# Altium PCB PCB1.PcbDoc
Units mm, origin at the board's own origin, x right, y up, seen from the top; angles counter-clockwise.
Board outline 45.1 x 100 mm, 2 copper layers (Top Layer, Bottom Layer); 94 components, 55 nets, 258 pads, 0 vias.
Unrouted connection lines stored in the file: 192.
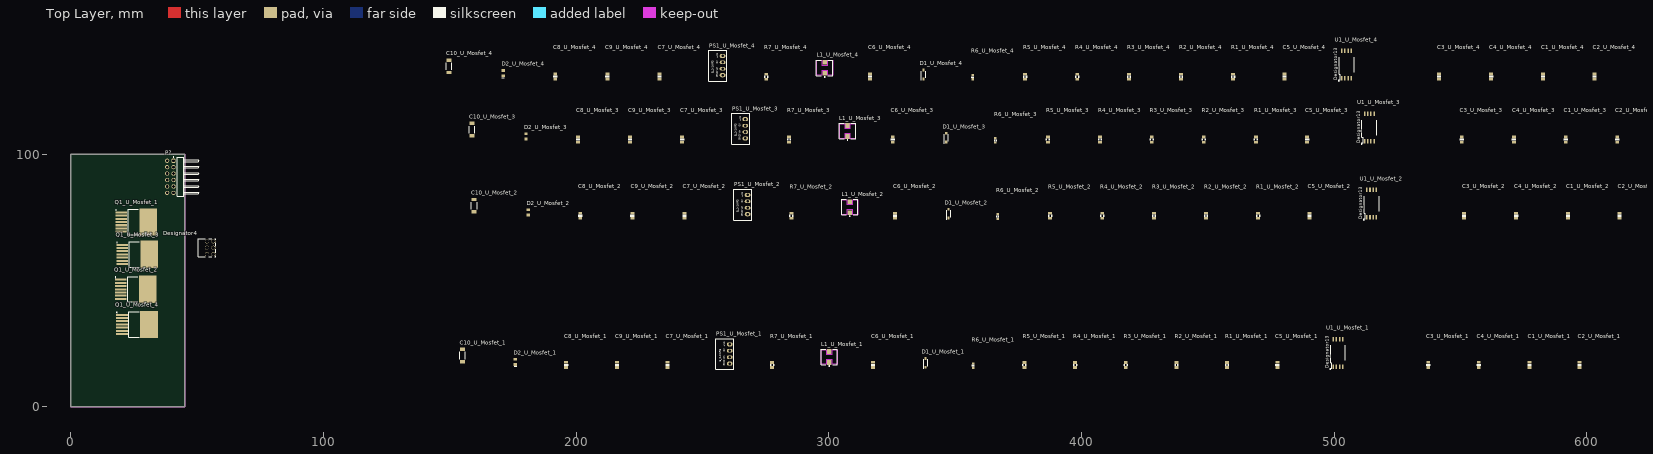
[diagram p0: Top Layer view]
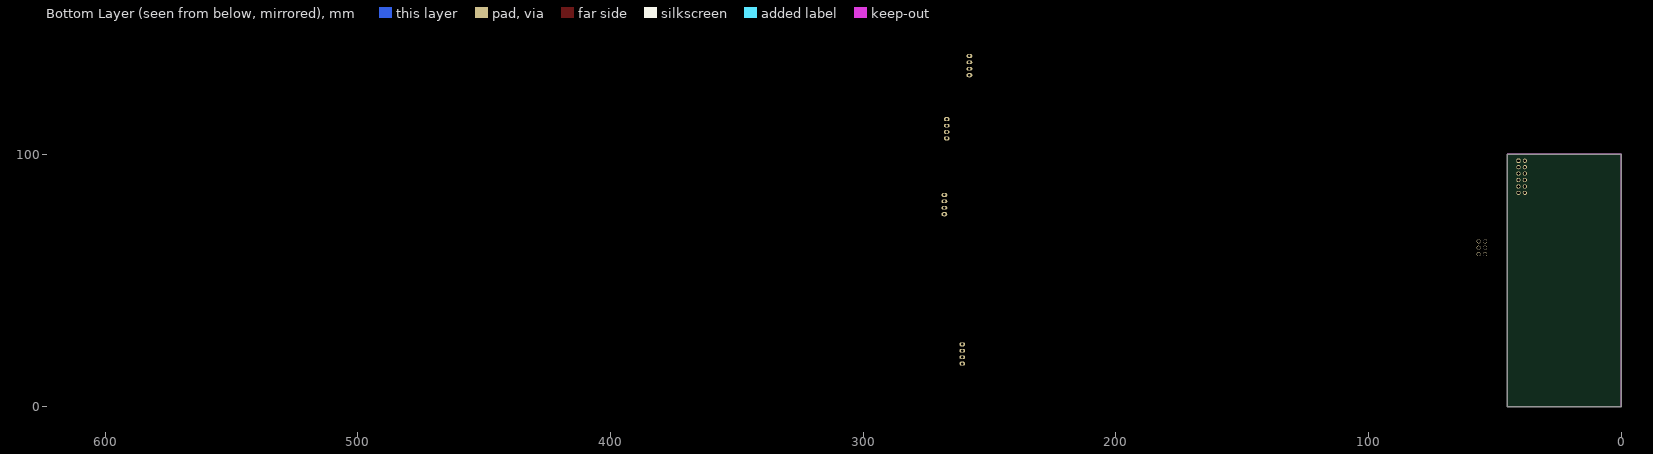
[diagram p1: Bottom Layer view, seen from below]

## Layer stack, top to bottom
Top Solder: solder mask 0.0102, Solder Resist, Dk 3.5
Top Layer: signal copper 0.0356
Dielectric 1: dielectric 0.32, FR-4, Dk 4.8
Bottom Layer: signal copper 0.0356
Bottom Solder: solder mask 0.0102, Solder Resist, Dk 3.5

## Board outline
0,0 0,100 45.1,100 45.1,0

## Design rules (kind name [scope] priority, off if disabled: settings)
Clearance [All] p1: gap=0.254 ignorepadtopadclearanceinfootprint=FALSE
DiffPairsRouting [All] p1: maxlimit=0.254 minlimit=0.254 mostfreqgap=0.254 toplayer_minwidth=0.381 toplayer_maxwidth=0.381 toplayer_prefwidth=0.381 bottomlayer_minwidth=0.381 bottomlayer_maxwidth=0.381 bottomlayer_prefwidth=0.381 maxuncoupledlength=12.7
PolygonConnect [All] p1: connectstyle=Relief reliefconductorwidth=0.254 reliefentries=4 polygonreliefangle="90 Angle" airgapwidth=0.254
RoomDefinition U_Mosfet_4 [InComponentClass('U_Mosfet_4')] p1: confinementstyle=ConfineIn formatcopy=TRUE lockcomponents=FALSE outline 148.301,128.6 621.5,128.6 621.5,149.5 148.301,149.5
RoomDefinition U_Mosfet_3 [InComponentClass('U_Mosfet_3')] p2: confinementstyle=ConfineIn formatcopy=TRUE lockcomponents=FALSE outline 157.301,103.7 630.5,103.7 630.5,124.5 157.301,124.5
RoomDefinition U_Mosfet_2 [InComponentClass('U_Mosfet_2')] p3: confinementstyle=ConfineIn formatcopy=TRUE lockcomponents=FALSE outline 158.201,73.6 631.4,73.6 631.4,94.5 158.201,94.5
RoomDefinition U_Mosfet_1 [InComponentClass('U_Mosfet_1')] p4: confinementstyle=ConfineIn formatcopy=TRUE lockcomponents=FALSE outline 153.6,14.5 615.099,14.5 615.099,35.4 153.6,35.4
RoutingVias [All] p1: holewidth=0.711 width=1.27 viastyle="Through Hole" minholewidth=0.711 minwidth=1.27 maxholewidth=0.711 maxwidth=1.27
SolderMaskExpansion [All] p1: expansion=0.102 istentingtop=FALSE
SupplyNets "Schematic Supply Nets_14" [InNet('+24V_ISO_U_Mosfet_1')] p1: voltage=0.000
SupplyNets "Schematic Supply Nets_13" [InNet('+24V_ISO_U_Mosfet_4')] p2: voltage=0.000
SupplyNets "Schematic Supply Nets_3" [InNet('GND_ISO_U_Mosfet_4')] p3: voltage=0.000
SupplyNets "Schematic Supply Nets_1" [InNet('GND_ISO_U_Mosfet_1')] p4: voltage=0.000
SupplyNets "Schematic Supply Nets_12" [InNet('+24V_ISO_U_Mosfet_3')] p5: voltage=0.000
SupplyNets "Schematic Supply Nets_9" [InNet('+24V_ISO_U_Mosfet_2')] p6: voltage=0.000
SupplyNets "Schematic Supply Nets_8" [InNet('GND_ISO_U_Mosfet_2')] p7: voltage=0.000
SupplyNets "Schematic Supply Nets_7" [InNet('GND_ISO_U_Mosfet_3')] p8: voltage=0.000
SupplyNets "Schematic Supply Nets_4" [InNet('GND')] p9: voltage=0.000
SupplyNets "Schematic Supply Nets_2" [InNet('+12V')] p10: voltage=0.000
SupplyNets "Schematic Supply Nets" [InNet('+5V')] p11: voltage=0.000
Width [All] p1: maxlimit=0.254 minlimit=0.254 preferedwidth=0.254
29 further rules are at their usual default settings.

## Classes and differential pairs
component class U_Mosfet_4: C1_U_Mosfet_4 C2_U_Mosfet_4 C3_U_Mosfet_4 C4_U_Mosfet_4 C5_U_Mosfet_4 C6_U_Mosfet_4 C7_U_Mosfet_4 C8_U_Mosfet_4 C9_U_Mosfet_4 C10_U_Mosfet_4 D1_U_Mosfet_4 D2_U_Mosfet_4 L1_U_Mosfet_4 PS1_U_Mosfet_4 Q1_U_Mosfet_4 R1_U_Mosfet_4 R2_U_Mosfet_4 R3_U_Mosfet_4 R4_U_Mosfet_4 R5_U_Mosfet_4 R6_U_Mosfet_4 R7_U_Mosfet_4 U1_U_Mosfet_4
component class U_Mosfet_1: C1_U_Mosfet_1 C2_U_Mosfet_1 C3_U_Mosfet_1 C4_U_Mosfet_1 C5_U_Mosfet_1 C6_U_Mosfet_1 C7_U_Mosfet_1 C8_U_Mosfet_1 C9_U_Mosfet_1 C10_U_Mosfet_1 D1_U_Mosfet_1 D2_U_Mosfet_1 L1_U_Mosfet_1 PS1_U_Mosfet_1 Q1_U_Mosfet_1 R1_U_Mosfet_1 R2_U_Mosfet_1 R3_U_Mosfet_1 R4_U_Mosfet_1 R5_U_Mosfet_1 R6_U_Mosfet_1 R7_U_Mosfet_1 U1_U_Mosfet_1
channel class Mosfet1: U_Mosfet_1 U_Mosfet_2 U_Mosfet_3 U_Mosfet_4
component class U_Mosfet_3: C1_U_Mosfet_3 C2_U_Mosfet_3 C3_U_Mosfet_3 C4_U_Mosfet_3 C5_U_Mosfet_3 C6_U_Mosfet_3 C7_U_Mosfet_3 C8_U_Mosfet_3 C9_U_Mosfet_3 C10_U_Mosfet_3 D1_U_Mosfet_3 D2_U_Mosfet_3 L1_U_Mosfet_3 PS1_U_Mosfet_3 Q1_U_Mosfet_3 R1_U_Mosfet_3 R2_U_Mosfet_3 R3_U_Mosfet_3 R4_U_Mosfet_3 R5_U_Mosfet_3 R6_U_Mosfet_3 R7_U_Mosfet_3 U1_U_Mosfet_3
component class U_Mosfet_2: C1_U_Mosfet_2 C2_U_Mosfet_2 C3_U_Mosfet_2 C4_U_Mosfet_2 C5_U_Mosfet_2 C6_U_Mosfet_2 C7_U_Mosfet_2 C8_U_Mosfet_2 C9_U_Mosfet_2 C10_U_Mosfet_2 D1_U_Mosfet_2 D2_U_Mosfet_2 L1_U_Mosfet_2 PS1_U_Mosfet_2 Q1_U_Mosfet_2 R1_U_Mosfet_2 R2_U_Mosfet_2 R3_U_Mosfet_2 R4_U_Mosfet_2 R5_U_Mosfet_2 R6_U_Mosfet_2 R7_U_Mosfet_2 U1_U_Mosfet_2
component class Main: P?
differential pair PWM_U_Mosfet_4: +PWM_U_Mosfet_4_P -PWM_U_Mosfet_4_N
differential pair PWM_U_Mosfet_1: +PWM_U_Mosfet_1_P -PWM_U_Mosfet_1_N
differential pair PWM_U_Mosfet_3: +PWM_U_Mosfet_3_P -PWM_U_Mosfet_3_N
differential pair PWM_U_Mosfet_2: +PWM_U_Mosfet_2_P -PWM_U_Mosfet_2_N

## Components (designator, comment, footprint, x,y, rotation, side; value= is the part's Value field where it differs from the comment)
C1_U_Mosfet_1 "1uF" "CAPC 0805" 577.299,16.6 r90 top (schematic designator C1)
C1_U_Mosfet_2 "1uF" "CAPC 0805" 592.5,75.6 r90 top (schematic designator C1)
C1_U_Mosfet_3 "1uF" "CAPC 0805" 591.6,105.7 r90 top (schematic designator C1)
C1_U_Mosfet_4 "1uF" "CAPC 0805" 582.6,130.7 r90 top (schematic designator C1)
C2_U_Mosfet_1 "10uF" "CAPC 0805" 597.099,16.6 r90 top (schematic designator C2)
C2_U_Mosfet_2 "10uF" "CAPC 0805" 612.9,75.6 r90 top (schematic designator C2)
C2_U_Mosfet_3 "10uF" "CAPC 0805" 612,105.7 r90 top (schematic designator C2)
C2_U_Mosfet_4 "10uF" "CAPC 0805" 603,130.7 r90 top (schematic designator C2)
C3_U_Mosfet_1 "100nF" "CAPC 0805" 537.199,16.6 r90 top (schematic designator C3)
C3_U_Mosfet_2 "100nF" "CAPC 0805" 551.4,75.6 r90 top (schematic designator C3)
C3_U_Mosfet_3 "100nF" "CAPC 0805" 550.5,105.7 r90 top (schematic designator C3)
C3_U_Mosfet_4 "100nF" "CAPC 0805" 541.5,130.7 r90 top (schematic designator C3)
C4_U_Mosfet_1 "100nF" "CAPC 0805" 557.199,16.6 r90 top (schematic designator C4)
C4_U_Mosfet_2 "100nF" "CAPC 0805" 572,75.6 r90 top (schematic designator C4)
C4_U_Mosfet_3 "100nF" "CAPC 0805" 571.1,105.7 r90 top (schematic designator C4)
C4_U_Mosfet_4 "100nF" "CAPC 0805" 562.1,130.7 r90 top (schematic designator C4)
C5_U_Mosfet_1 "10uF" "CAPC 0805" 477.499,16.6 r90 top (schematic designator C5)
C5_U_Mosfet_2 "10uF" "CAPC 0805" 490.2,75.6 r90 top (schematic designator C5)
C5_U_Mosfet_3 "10uF" "CAPC 0805" 489.3,105.7 r90 top (schematic designator C5)
C5_U_Mosfet_4 "10uF" "CAPC 0805" 480.3,130.7 r90 top (schematic designator C5)
C6_U_Mosfet_1 "4.7uF" "CAPC 0805" 317.499,16.6 r90 top (schematic designator C6)
C6_U_Mosfet_2 "4.7uF" "CAPC 0805" 326.2,75.6 r90 top (schematic designator C6)
C6_U_Mosfet_3 "4.7uF" "CAPC 0805" 325.3,105.7 r90 top (schematic designator C6)
C6_U_Mosfet_4 "4.7uF" "CAPC 0805" 316.3,130.7 r90 top (schematic designator C6)
C7_U_Mosfet_1 "1uF" "CAPC 0805" 236.199,16.6 r90 top (schematic designator C7)
C7_U_Mosfet_2 "1uF" "CAPC 0805" 242.9,75.6 r90 top (schematic designator C7)
C7_U_Mosfet_3 "1uF" "CAPC 0805" 242,105.7 r90 top (schematic designator C7)
C7_U_Mosfet_4 "1uF" "CAPC 0805" 233,130.7 r90 top (schematic designator C7)
C8_U_Mosfet_1 "4.7uF" "CAPC 0805" 196.1,16.6 r90 top (schematic designator C8)
C8_U_Mosfet_2 "4.7uF" "CAPC 0805" 201.701,75.6 r90 top (schematic designator C8)
C8_U_Mosfet_3 "4.7uF" "CAPC 0805" 200.801,105.7 r90 top (schematic designator C8)
C8_U_Mosfet_4 "4.7uF" "CAPC 0805" 191.801,130.7 r90 top (schematic designator C8)
C9_U_Mosfet_1 "4.7uF" "CAPC 0805" 216.2,16.6 r90 top (schematic designator C9)
C9_U_Mosfet_2 "4.7uF" "CAPC 0805" 222.3,75.6 r90 top (schematic designator C9)
C9_U_Mosfet_3 "4.7uF" "CAPC 0805" 221.401,105.7 r90 top (schematic designator C9)
C9_U_Mosfet_4 "4.7uF" "CAPC 0805" 212.401,130.7 r90 top (schematic designator C9)
C10_U_Mosfet_1 "220 pF" WCAP-CSSA_1808_8853620100181 155.1,20.3 r90 top (schematic designator C10)
C10_U_Mosfet_2 "220 pF" WCAP-CSSA_1808_8853620100181 159.701,79.6 r90 top (schematic designator C10)
C10_U_Mosfet_3 "220 pF" WCAP-CSSA_1808_8853620100181 158.801,109.7 r90 top (schematic designator C10)
C10_U_Mosfet_4 "220 pF" WCAP-CSSA_1808_8853620100181 149.801,134.7 r90 top (schematic designator C10)
D1_U_Mosfet_1 "SZMMSZ3V3T1G" SOD3716X135N 338.299,17.4 r90 top (schematic designator D1)
D1_U_Mosfet_2 "SZMMSZ3V3T1G" SOD3716X135N 347.4,76.4 r90 top (schematic designator D1)
D1_U_Mosfet_3 "SZMMSZ3V3T1G" SOD3716X135N 346.5,106.5 r90 top (schematic designator D1)
D1_U_Mosfet_4 "SZMMSZ3V3T1G" SOD3716X135N 337.5,131.5 r90 top (schematic designator D1)
D2_U_Mosfet_1 "Red, 2V, 140°" WL-SMCW_0805_150080xx75000 176,17.8 r90 top (schematic designator D2)
D2_U_Mosfet_2 "Red, 2V, 140°" WL-SMCW_0805_150080xx75000 181.101,76.9 r90 top (schematic designator D2)
D2_U_Mosfet_3 "Red, 2V, 140°" WL-SMCW_0805_150080xx75000 180.201,107 r90 top (schematic designator D2)
D2_U_Mosfet_4 "Red, 2V, 140°" WL-SMCW_0805_150080xx75000 171.201,132 r90 top (schematic designator D2)
Designator4 "Comment" "74622103_chemical surface" 53.96,62.94 r90 top
L1_U_Mosfet_1 "6.8μH" WE-PD_6033R 300.199,19.7 r90 top (schematic designator L1)
L1_U_Mosfet_2 "6.8μH" WE-PD_6033R 308.3,79 r90 top (schematic designator L1)
L1_U_Mosfet_3 "6.8μH" WE-PD_6033R 307.4,109.1 r90 top (schematic designator L1)
L1_U_Mosfet_4 "6.8μH" WE-PD_6033R 298.4,134.1 r90 top (schematic designator L1)
P? "61301221021" 61301221021 43.5,91 r90 top
PS1_U_Mosfet_1 "B_S-1WR3" B_S-1WR3 260.799,20.9 r90 top (schematic designator PS1)
PS1_U_Mosfet_2 "B_S-1WR3" B_S-1WR3 267.9,80 r90 top (schematic designator PS1)
PS1_U_Mosfet_3 "B_S-1WR3" B_S-1WR3 267,110 r90 top (schematic designator PS1)
PS1_U_Mosfet_4 "B_S-1WR3" B_S-1WR3 258,135 r90 top (schematic designator PS1)
Q1_U_Mosfet_1 "IMBG65R050M2H" TO127P1500X470-8N-2-V1 25.4,73.1 r0 top (schematic designator Q1)
Q1_U_Mosfet_2 "IMBG65R050M2H" TO127P1500X470-8N-2-V1 25.2,46.5 r0 top (schematic designator Q1)
Q1_U_Mosfet_3 "IMBG65R050M2H" TO127P1500X470-8N-2-V1 25.8,60.3 r0 top (schematic designator Q1)
Q1_U_Mosfet_4 "IMBG65R050M2H" TO127P1500X470-8N-2-V1 25.7,32.6 r0 top (schematic designator Q1)
R1_U_Mosfet_1 "3.3K" "RESC 0805" 457.599,16.5 r90 top (schematic designator R1)
R1_U_Mosfet_2 "3.3K" "RESC 0805" 469.9,75.6 r90 top (schematic designator R1)
R1_U_Mosfet_3 "3.3K" "RESC 0805" 469,105.7 r90 top (schematic designator R1)
R1_U_Mosfet_4 "3.3K" "RESC 0805" 460,130.6 r90 top (schematic designator R1)
R2_U_Mosfet_1 "56R" "RESC 0805" 437.599,16.5 r90 top (schematic designator R2)
R2_U_Mosfet_2 "56R" "RESC 0805" 449.3,75.6 r90 top (schematic designator R2)
R2_U_Mosfet_3 "56R" "RESC 0805" 448.4,105.7 r90 top (schematic designator R2)
R2_U_Mosfet_4 "56R" "RESC 0805" 439.4,130.6 r90 top (schematic designator R2)
R3_U_Mosfet_1 "10R" "RESC 0805" 417.499,16.5 r90 top (schematic designator R3)
R3_U_Mosfet_2 "10R" "RESC 0805" 428.7,75.6 r90 top (schematic designator R3)
R3_U_Mosfet_3 "10R" "RESC 0805" 427.8,105.7 r90 top (schematic designator R3)
R3_U_Mosfet_4 "10R" "RESC 0805" 418.8,130.6 r90 top (schematic designator R3)
R4_U_Mosfet_1 "10R" "RESC 0805" 397.499,16.5 r90 top (schematic designator R4)
R4_U_Mosfet_2 "10R" "RESC 0805" 408.2,75.6 r90 top (schematic designator R4)
R4_U_Mosfet_3 "10R" "RESC 0805" 407.3,105.7 r90 top (schematic designator R4)
R4_U_Mosfet_4 "10R" "RESC 0805" 398.3,130.6 r90 top (schematic designator R4)
R5_U_Mosfet_1 "56R" "RESC 0805" 377.399,16.5 r90 top (schematic designator R5)
R5_U_Mosfet_2 "56R" "RESC 0805" 387.6,75.6 r90 top (schematic designator R5)
R5_U_Mosfet_3 "56R" "RESC 0805" 386.7,105.7 r90 top (schematic designator R5)
R5_U_Mosfet_4 "56R" "RESC 0805" 377.7,130.6 r90 top (schematic designator R5)
R6_U_Mosfet_1 "0R" "RESC 0603" 357.099,16.3 r90 top (schematic designator R6)
R6_U_Mosfet_2 "0R" "RESC 0603" 366.8,75.3 r90 top (schematic designator R6)
R6_U_Mosfet_3 "0R" "RESC 0603" 365.9,105.4 r90 top (schematic designator R6)
R6_U_Mosfet_4 "0R" "RESC 0603" 356.9,130.4 r90 top (schematic designator R6)
R7_U_Mosfet_1 "1.2K" "RESC 0805" 277.599,16.5 r90 top (schematic designator R7)
R7_U_Mosfet_2 "1.2K" "RESC 0805" 285.2,75.6 r90 top (schematic designator R7)
R7_U_Mosfet_3 "1.2K" "RESC 0805" 284.3,105.7 r90 top (schematic designator R7)
R7_U_Mosfet_4 "1.2K" "RESC 0805" 275.3,130.6 r90 top (schematic designator R7)
U1_U_Mosfet_1 "UCC5320SCDWV" DWV0008A 501.499,21.3 r90 top (schematic designator U1)
U1_U_Mosfet_2 "UCC5320SCDWV" DWV0008A 514.8,80.4 r90 top (schematic designator U1)
U1_U_Mosfet_3 "UCC5320SCDWV" DWV0008A 513.9,110.5 r90 top (schematic designator U1)
U1_U_Mosfet_4 "UCC5320SCDWV" DWV0008A 504.9,135.4 r90 top (schematic designator U1)

## Footprints (in the part's own frame and the unit in brackets; to place one, negate y for a bottom-side part, rotate by r counter-clockwise, add the part's x,y. Pads: shape width x height; smd on the part's side, far side on the other; paste and mask are expansions set on the pad)
"74622103_chemical surface" [mm] "REDCUBE PRESS-FIT, body 7 x 7 mm"
  round 1.6 hole 1.475: 1(-2.54,-2.54) 1(-2.54,0) 1(0,0) 1(0,-2.54) 1(2.54,-2.54) 1(2.54,0)
  silkscreen extent -3.5,-3.5 3.5,3.5, body extent -3.5,0 3.5,17.5, height 7
61301221021 [mm] "Pin Header, pitch 2.54 mm, THT, Angled, dual row, 12p"
  rrect50% 1.65x1.65 hole 1.1: 1(6.35,2.73)
  round 1.65 hole 1.1: 2(6.35,5.27) 3(3.81,2.73) 4(3.81,5.27) 5(1.27,2.73) 6(1.27,5.27) 7(-1.27,2.73) 8(-1.27,5.27) 9(-3.81,2.73) 10(-3.81,5.27) 11(-6.35,2.73) 12(-6.35,5.27)
  silkscreen extent -7.77,-7.27 7.9,2.82, body extent -7.62,-7.27 7.62,5.63, height 5.12
B_S-1WR3 [mm]
  oval 1.6x2.3 hole 1: 1(-3.81,0) 4(3.81,0)
  oval 1.4x2.3 hole 1: 2(-1.27,0) 3(1.27,0)
  silkscreen extent -6.1,-1.66 6.1,5.45, body extent -5.81,-0.88 5.79,5.12, height 10.2
"CAPC 0805" [mm] "Chip Resistor, Body 2.0x1.3mm, IPC Medium Density"
  rect 1.1x1.52 smd: 1(-1,0) 2(1,0)
  silkscreen extent -0.33,-0.75 0.32,0.75, body extent -1,-0.62 1,0.63, height 0.78
DWV0008A [mm]
  rect 1.8x0.6 smd paste+0 mask+0.051: 1(-5.45,1.905) 2(-5.45,0.635) 3(-5.45,-0.635) 4(-5.45,-1.905) 5(5.45,-1.905) 6(5.45,-0.635) 7(5.45,0.635) 8(5.45,1.905)
  silkscreen extent -6.53,-2.95 2.98,3.23, body extent -5.77,-2.93 5.77,2.93, height 2.72
"RESC 0603" [mm] "Chip Resistor, Body 1.6x0.8mm, IPC Medium Density"
  rect 0.9x1 smd: 1(-0.85,0) 2(0.85,0)
  silkscreen extent -0.28,-0.5 0.28,0.5, body extent -0.8,-0.4 0.8,0.4, height 0.3
"RESC 0805" [mm] "Chip Resistor, Body 2.0x1.3mm, IPC Medium Density"
  rect 1.1x1.52 smd: 1(-1,0) 2(1,0)
  silkscreen extent -0.33,-0.75 0.33,0.75, body extent -1,-0.62 1,0.63, height 0.78
SOD3716X135N [mm]
  rect 1.15x0.8 smd: 1(-1.75,0) 2(1.75,0)
  silkscreen extent -2.32,-0.8 1.35,0.8, body extent -1.86,-0.8 1.86,0.8, height 1.35
TO127P1500X470-8N-2-V1 [mm] "TO,1.27mm pitch;7 pin,15.00mm L X 9.25mm W X 4.70mm H body"
  rect 4.7x0.8 smd paste-0.05 mask+0: 1(-5.35,3.81) 2(-5.35,2.54) 3(-5.35,1.27) 4(-5.35,0) 5(-5.35,-1.27) 6(-5.35,-2.54) 7(-5.35,-3.81)
  rect 7.1x10.8 smd paste-3.55 mask+0: 8(5.35,0)
  silkscreen extent -7.52,-5 1.4,5, body extent -6.4,-5 8.55,5, height 4.51
WCAP-CSSA_1808_8853620100181 [mm] "Ceramic Capacitors, body 4.50x2.00mm"
  rect 1.35x2 smd: 1(-2.425,0) 2(2.425,0)
  silkscreen extent -1.4,-1.12 1.4,1.12, body extent -2.25,-1 2.25,1, height 2
WE-PD_6033R [mm] "SMT Shielded Power Inductor, 2-leads, body 5.9x6.2mm"
  rect 1.85x1.9 smd: 1(-2.175,0) 2(2.175,0)
  Top Layer keep-out region: -2.95,-3.1 -2.95,-1.15 -1.05,-1.15 -1.05,1.15 -2.95,1.15 -2.95,3.1 2.95,3.1 2.95,1.15 1.05,1.15 1.05,-1.15 2.95,-1.15 2.95,-3.1
  silkscreen extent -3.72,-3.25 3.1,3.25, body extent -2.95,-3.1 2.95,3.1, height 2.9
WL-SMCW_0805_150080xx75000 [mm] "SMD Mono-color Chip LED, body 2.0x1.25mm"
  rect 1.1x1.3 smd: 1(-1.05,0) 2(1.05,0)
  silkscreen extent -2,-0.6 -1.8,0.6, body extent -1,-0.63 1,0.62, height 0.7

## Part data
C1_U_Mosfet_1 C1_U_Mosfet_2 C1_U_Mosfet_3 C1_U_Mosfet_4: library part CAPC0709, "Capacitor Ceramic 1uF 16V 0805", Package / Case=0805, Tolerance=%10, Value Rating=uF, Values="1uF 16V", Voltage=16V, Category="Capacitor Ceramic", Part Number=CAPC0709
C2_U_Mosfet_1 C2_U_Mosfet_2 C2_U_Mosfet_3 C2_U_Mosfet_4 C5_U_Mosfet_1 C5_U_Mosfet_2 C5_U_Mosfet_3 C5_U_Mosfet_4: library part CAPC0588, "Capacitor Ceramic 10uF 50V 0805", Package / Case=0805, Tolerance=%10, Value Rating=uF, Values="10uF 50V", Voltage=50V, Category="Capacitor Ceramic", Part Number=CAPC0588
C3_U_Mosfet_1 C3_U_Mosfet_2 C3_U_Mosfet_3 C3_U_Mosfet_4: library part CAPC0701, "Capacitor Ceramic 100nF 16V 0805", Package / Case=0805, Tolerance=%10, Value Rating=nF, Values="100nF 16V", Voltage=16V, Category="Capacitor Ceramic", Part Number=CAPC0701
C4_U_Mosfet_1 C4_U_Mosfet_2 C4_U_Mosfet_3 C4_U_Mosfet_4: library part CAPC0572, "Capacitor Ceramic 100nF 50V 0805", Package / Case=0805, Tolerance=%10, Value Rating=nF, Values="100nF 50V", Voltage=50V, Category="Capacitor Ceramic", Favorites=Favorite, Part Number=CAPC0572
C6_U_Mosfet_1 C6_U_Mosfet_2 C6_U_Mosfet_3 C6_U_Mosfet_4 C8_U_Mosfet_1 C8_U_Mosfet_2 C8_U_Mosfet_3 C8_U_Mosfet_4 C9_U_Mosfet_1 C9_U_Mosfet_2 C9_U_Mosfet_3 C9_U_Mosfet_4: library part CAPC0584, "Capacitor Ceramic 4.7uF 50V 0805", Package / Case=0805, Tolerance=%10, Value Rating=uF, Values="4.7uF 50V", Voltage=50V, Category="Capacitor Ceramic", Part Number=CAPC0584
C7_U_Mosfet_1 C7_U_Mosfet_2 C7_U_Mosfet_3 C7_U_Mosfet_4: library part CAPC0580, "Capacitor Ceramic 1uF 50V 0805", Package / Case=0805, Tolerance=%10, Value Rating=uF, Values="1uF 50V", Voltage=50V, Category="Capacitor Ceramic", Favorites=Favorite, Part Number=CAPC0580
C10_U_Mosfet_1 C10_U_Mosfet_2 C10_U_Mosfet_3 C10_U_Mosfet_4: library part 8853620100181, "WCAP-CSSA Multilayer Ceramic Chip Safety Capacitor, SMT, size 1808, NP0 Class I, 220 pF, 250 V (AC)", Capacitance Tolerance=±5%, Case/Size Code=1808, Manufacturer="Wurth Elektronik", Max Operating Temperature="125 °C", Min Operating Temperature="-55 °C", Rated Voltage="250 V (AC)", Impulse Voltage="2500 V (DC)", Insulation Resistance="100 GΩ", Capacitance="220 pF", Category="Multilayer Ceramic Chip Capacitors", Ceramic Type="NP0 Class I", ComponentLink1Description="Website Link", ComponentLink1URL=https://www.we-online.com/redexpert/article/8853620100181?ad, ComponentLink2Description="Datasheet Link", ComponentLink2URL=https://www.we-online.com/redexpert/spec/8853620100181?ad, Dissipation Factor=0.1%, Height="2 mm", Length="4.5 mm", Manufacturer Part Number=8853620100181, Match Code=WCAP-CSSA, Mount="Surface Mount", Packaging="Tape and Reel", Safety Class=X2, Width="2 mm", Simulation ModelName=1808_8853620100181_220pF, Simulation PortMap=(1:1),(2:2)
D1_U_Mosfet_1 D1_U_Mosfet_2 D1_U_Mosfet_3 D1_U_Mosfet_4: "500 mW Rating on FR-4 or FR-5 Board; Wide Zener Reverse Voltage Range - 2.4 V to 56 V; Package Designed for Optimal Automated Board Assembly; Small Package Size for High Density Applications; ESD Rating of Class 3 (exceeding 16 kV) per the Human Body Model Mechanical Characteristics:; CASE: Void-free, transfer-molded, thermosetting plastic case; FINISH: Corrosion resistant finish, easily solderable; MAXIMUM CASE TEMPERATURE FOR SOLDERING PURPOSES: 260C for 10 Seconds; POLARITY: Cathode indicated by polarit", Manufacturer_Name=onsemi, Mouser Part Number=863-SZMMSZ3V3T1G, Datasheet Link=https://www.onsemi.com/pub/Collateral/MMSZ2V4T1-D.PDF, Geometry.Height=1.35mm, Manufacturer_Part_Number=SZMMSZ3V3T1G, Mouser Price/Stock=https://www.mouser.co.uk/ProductDetail/onsemi/SZMMSZ3V3T1G?qs=PJJcWtbOkNWDWixFbpUCfA%3D%3D
D2_U_Mosfet_1 D2_U_Mosfet_2 D2_U_Mosfet_3 D2_U_Mosfet_4: library part 150080RS75000, "WL-SMCW Mono-color Chip LED Waterclear, SMT, size 0805, Red, 2V, 140°", Case/Size Code=0805, Emitting Color=Red, Forward Voltage=2V, Manufacturer="Wurth Elektronik", Max Operating Temperature=85°C, Min Operating Temperature=-40°C, Category="Signal LEDs", Chip Technology=AlInGaP, ComponentLink1Description="Website Link", ComponentLink1URL=https://www.we-online.com/redexpert/article/150080RS75000?ad, ComponentLink2Description="Datasheet Link", ComponentLink2URL=https://www.we-online.com/redexpert/spec/150080RS75000?ad, Dominant Wavelength=625nm, Height=0.7mm, Length=2mm, Luminous Intensity=150mcd, Manufacturer Part Number=150080RS75000, Match Code=WL-SMCW, Mount="Surface Mount", Packaging="Tape and Reel", Peak Wavelength=630nm, Viewing Angle=140°, Width=1.25mm, Simulation ModelName=0805_150080RS75000, Simulation PortMap=(1:2),(2:1)
Designator4: library part 74622103
L1_U_Mosfet_1 L1_U_Mosfet_2 L1_U_Mosfet_3 L1_U_Mosfet_4: library part 7447785006, "WE-PD SMT Power Inductor, size 6033R, 6.8μH, 2.3A, 100mΩ", Case/Size Code=6033R, DC Resistance=79mΩ, DC Resistance Max=100mΩ, Manufacturer="Wurth Elektronik", Max Operating Temperature=125°C, Min Operating Temperature=-40°C, Rated Current=2.3A, Saturation Current=2A, Self Resonant Frequency=45MHz, Category="Power Inductors", ComponentLink1Description="Website Link", ComponentLink1URL=https://www.we-online.com/redexpert/article/7447785006?ad, ComponentLink2Description="Datasheet Link", ComponentLink2URL=https://www.we-online.com/redexpert/spec/7447785006?ad, Height=3.3mm, Length=5.9mm, Manufacturer Part Number=7447785006, Match Code=WE-PD, Mount="Surface Mount", Packaging="Tape and Reel", Type=Robust, Width=6.2mm, Inductance=6.8μH, Simulation ModelName=6033_7447785006_6.8u, Simulation PortMap=(1:1),(2:2)
P?: "WR-PHD Pin Header, THT, Angled, pitch 2.54mm, 2 Row, 12P", Contact Resistance=20mOhm, Manufacturer="Wurth Elektronik", Max Operating Temperature=105°C, Min Operating Temperature=-40°C, Rated Current=3A, Withstanding Voltage=500V, Working Voltage=250V, Category="Board-to-Board Connectors", ComponentLink1Description="Website Link", ComponentLink1URL=https://www.we-online.com/redexpert/article/61301221021?ad, ComponentLink2Description="Datasheet Link", ComponentLink2URL=https://www.we-online.com/redexpert/spec/61301221021?ad, Gender="Pin Header", Lead Pitch=2.54mm, Manufacturer Part Number=61301221021, Match Code=WR-PHD, Mount="Through Hole", Number of Pins=12, Number of Rows=2, Orientation=Angled, Packaging=Bag
Q1_U_Mosfet_1 Q1_U_Mosfet_2 Q1_U_Mosfet_3 Q1_U_Mosfet_4: "Insulated-Gate Field-Effect Transistor (IGFET), N-Channel, Enhancement, Body Diode, Pin 1 Gate, 2 Driver Source, 3 Power Source, 4 Power Source, 5 Power Source, 6 Power Source, 7 Power Source, 8 Drain, 8 Pins", Manufacturer="Infineon Technologies", Manufacturer Order Number=IMBG65R050M2H, PackageReference=PG-TO263-7-12
R1_U_Mosfet_1 R1_U_Mosfet_2 R1_U_Mosfet_3 R1_U_Mosfet_4: library part R0354, "3.3K 0805", Package / Case=0805, Power=1/10W, Tolerance=%5, Category=Resistor, Part Number=R0354, Values=3.3K
R2_U_Mosfet_1 R2_U_Mosfet_2 R2_U_Mosfet_3 R2_U_Mosfet_4 R5_U_Mosfet_1 R5_U_Mosfet_2 R5_U_Mosfet_3 R5_U_Mosfet_4: library part R0312, "56R 0805", Package / Case=0805, Power=1/10W, Tolerance=%5, Category=Resistor, Part Number=R0312, Values=56R
R3_U_Mosfet_1 R3_U_Mosfet_2 R3_U_Mosfet_3 R3_U_Mosfet_4 R4_U_Mosfet_1 R4_U_Mosfet_2 R4_U_Mosfet_3 R4_U_Mosfet_4: library part R0295, "10R 0805", Package / Case=0805, Power=1/10W, Tolerance=%5, Category=Resistor, Part Number=R0295, Values=10R
R6_U_Mosfet_1 R6_U_Mosfet_2 R6_U_Mosfet_3 R6_U_Mosfet_4: library part R0148, "0R 0603", Package / Case=0603, Power=1/10W, Tolerance=%5, Category=Resistor, Part Number=R0148, Values=0R
R7_U_Mosfet_1 R7_U_Mosfet_2 R7_U_Mosfet_3 R7_U_Mosfet_4: library part R0344, "1.2K 0805", Package / Case=0805, Power=1/10W, Tolerance=%5, Category=Resistor, Part Number=R0344, Values=1.2K
U1_U_Mosfet_1 U1_U_Mosfet_2 U1_U_Mosfet_3 U1_U_Mosfet_4: "3k/5kVrms, 2A/2A single-channel isolated gate driver with UVLO referenced to GND or split output 8-SOIC -40 to 125", Manufacturer_Name="Texas Instruments", Copyright="Copyright (C) 2025 Ultra Librarian. All rights reserved.", Datasheet=https://www.ti.com/lit/gpn/ucc5320, Manufacturer_Part_Number=UCC5320SCDWV, RefDes=RefDes, Type=TYPE
PS1_U_Mosfet_1 PS1_U_Mosfet_2 PS1_U_Mosfet_3 PS1_U_Mosfet_4: Datasheet_Link=https://www.mornsun-power.com/html/pdf/B1224S-1WR3.html, Supply_Link=https://www.motorobit.com/b1224s-1wr3-dc-dc-1w-108-132v-giris-24v-cikis-voltaj-donusturucu

## Nets (pads, with @x,y where several pads share a name; then routed paths per layer and width w, separated by ;. In a path a pad name is that pad's centre, name@x,y a point inside that pad or via, vN(x,y) a via of type N, cw(c..) or ccw(c..) an arc to the next point about the centre after c; other vN are vias at no path point)
+5V: C1_U_Mosfet_1.1 C1_U_Mosfet_2.1 C1_U_Mosfet_3.1 C1_U_Mosfet_4.1 C3_U_Mosfet_1.1 C3_U_Mosfet_2.1 C3_U_Mosfet_3.1 C3_U_Mosfet_4.1 P?.1 U1_U_Mosfet_1.1 U1_U_Mosfet_2.1 U1_U_Mosfet_3.1 U1_U_Mosfet_4.1
+12V: C8_U_Mosfet_1.2 C8_U_Mosfet_2.2 C8_U_Mosfet_3.2 C8_U_Mosfet_4.2 L1_U_Mosfet_1.1 L1_U_Mosfet_2.1 L1_U_Mosfet_3.1 L1_U_Mosfet_4.1 P?.2
+24V_ISO_U_Mosfet_1: C2_U_Mosfet_1.1 C4_U_Mosfet_1.1 C5_U_Mosfet_1.2 C7_U_Mosfet_1.2 PS1_U_Mosfet_1.4 R1_U_Mosfet_1.2 R7_U_Mosfet_1.2 U1_U_Mosfet_1.5
+24V_ISO_U_Mosfet_2: C2_U_Mosfet_2.1 C4_U_Mosfet_2.1 C5_U_Mosfet_2.2 C7_U_Mosfet_2.2 PS1_U_Mosfet_2.4 R1_U_Mosfet_2.2 R7_U_Mosfet_2.2 U1_U_Mosfet_2.5
+24V_ISO_U_Mosfet_3: C2_U_Mosfet_3.1 C4_U_Mosfet_3.1 C5_U_Mosfet_3.2 C7_U_Mosfet_3.2 PS1_U_Mosfet_3.4 R1_U_Mosfet_3.2 R7_U_Mosfet_3.2 U1_U_Mosfet_3.5
+24V_ISO_U_Mosfet_4: C2_U_Mosfet_4.1 C4_U_Mosfet_4.1 C5_U_Mosfet_4.2 C7_U_Mosfet_4.2 PS1_U_Mosfet_4.4 R1_U_Mosfet_4.2 R7_U_Mosfet_4.2 U1_U_Mosfet_4.5
Drain_U_Mosfet_1: Q1_U_Mosfet_1.8 Q1_U_Mosfet_2.8
Drain_U_Mosfet_3: D1_U_Mosfet_1.1 Q1_U_Mosfet_1.2 Q1_U_Mosfet_1.3 Q1_U_Mosfet_1.4 Q1_U_Mosfet_1.5 Q1_U_Mosfet_1.6 Q1_U_Mosfet_1.7 Q1_U_Mosfet_3.8 R1_U_Mosfet_1.1
Drain_U_Mosfet_4: D1_U_Mosfet_2.1 Q1_U_Mosfet_2.2 Q1_U_Mosfet_2.3 Q1_U_Mosfet_2.4 Q1_U_Mosfet_2.5 Q1_U_Mosfet_2.6 Q1_U_Mosfet_2.7 Q1_U_Mosfet_4.8 R1_U_Mosfet_2.1
Gate_U_Mosfet_1: Q1_U_Mosfet_1.1 R3_U_Mosfet_1.2 R4_U_Mosfet_1.2
Gate_U_Mosfet_2: Q1_U_Mosfet_2.1 R3_U_Mosfet_2.2 R4_U_Mosfet_2.2
Gate_U_Mosfet_3: Q1_U_Mosfet_3.1 R3_U_Mosfet_3.2 R4_U_Mosfet_3.2
Gate_U_Mosfet_4: Q1_U_Mosfet_4.1 R3_U_Mosfet_4.2 R4_U_Mosfet_4.2
GND: C1_U_Mosfet_1.2 C1_U_Mosfet_2.2 C1_U_Mosfet_3.2 C1_U_Mosfet_4.2 C3_U_Mosfet_1.2 C3_U_Mosfet_2.2 C3_U_Mosfet_3.2 C3_U_Mosfet_4.2 C8_U_Mosfet_1.1 C8_U_Mosfet_2.1 C8_U_Mosfet_3.1 C8_U_Mosfet_4.1 C9_U_Mosfet_1.1 C9_U_Mosfet_2.1 C9_U_Mosfet_3.1 C9_U_Mosfet_4.1 C10_U_Mosfet_1.1 C10_U_Mosfet_2.1 C10_U_Mosfet_3.1 C10_U_Mosfet_4.1 P?.11 PS1_U_Mosfet_1.1 PS1_U_Mosfet_2.1 PS1_U_Mosfet_3.1 PS1_U_Mosfet_4.1 R6_U_Mosfet_1.1 R6_U_Mosfet_2.1 R6_U_Mosfet_3.1 R6_U_Mosfet_4.1 U1_U_Mosfet_1.4 U1_U_Mosfet_2.4 U1_U_Mosfet_3.4 U1_U_Mosfet_4.4
GND_ISO_U_Mosfet_1: C2_U_Mosfet_1.2 C4_U_Mosfet_1.2 C6_U_Mosfet_1.1 C7_U_Mosfet_1.1 C10_U_Mosfet_1.2 D1_U_Mosfet_1.2 PS1_U_Mosfet_1.3 U1_U_Mosfet_1.8
GND_ISO_U_Mosfet_2: C2_U_Mosfet_2.2 C4_U_Mosfet_2.2 C6_U_Mosfet_2.1 C7_U_Mosfet_2.1 C10_U_Mosfet_2.2 D1_U_Mosfet_2.2 PS1_U_Mosfet_2.3 U1_U_Mosfet_2.8
GND_ISO_U_Mosfet_3: C2_U_Mosfet_3.2 C4_U_Mosfet_3.2 C6_U_Mosfet_3.1 C7_U_Mosfet_3.1 C10_U_Mosfet_3.2 D1_U_Mosfet_3.2 PS1_U_Mosfet_3.3 U1_U_Mosfet_3.8
GND_ISO_U_Mosfet_4: C2_U_Mosfet_4.2 C4_U_Mosfet_4.2 C6_U_Mosfet_4.1 C7_U_Mosfet_4.1 C10_U_Mosfet_4.2 D1_U_Mosfet_4.2 PS1_U_Mosfet_4.3 U1_U_Mosfet_4.8
NetC5_U_Mosfet_1_1: C5_U_Mosfet_1.1 C6_U_Mosfet_1.2
NetC5_U_Mosfet_2_1: C5_U_Mosfet_2.1 C6_U_Mosfet_2.2
NetC5_U_Mosfet_3_1: C5_U_Mosfet_3.1 C6_U_Mosfet_3.2
NetC5_U_Mosfet_4_1: C5_U_Mosfet_4.1 C6_U_Mosfet_4.2
NetC9_U_Mosfet_1_2: C9_U_Mosfet_1.2 L1_U_Mosfet_1.2 PS1_U_Mosfet_1.2
NetC9_U_Mosfet_2_2: C9_U_Mosfet_2.2 L1_U_Mosfet_2.2 PS1_U_Mosfet_2.2
NetC9_U_Mosfet_3_2: C9_U_Mosfet_3.2 L1_U_Mosfet_3.2 PS1_U_Mosfet_3.2
NetC9_U_Mosfet_4_2: C9_U_Mosfet_4.2 L1_U_Mosfet_4.2 PS1_U_Mosfet_4.2
NetD2_U_Mosfet_1_2: D2_U_Mosfet_1.2 R7_U_Mosfet_1.1
NetD2_U_Mosfet_2_2: D2_U_Mosfet_2.2 R7_U_Mosfet_2.1
NetD2_U_Mosfet_3_2: D2_U_Mosfet_3.2 R7_U_Mosfet_3.1
NetD2_U_Mosfet_4_2: D2_U_Mosfet_4.2 R7_U_Mosfet_4.1
NetR2_U_Mosfet_1_2: R2_U_Mosfet_1.2 U1_U_Mosfet_1.2
NetR2_U_Mosfet_2_2: R2_U_Mosfet_2.2 U1_U_Mosfet_2.2
NetR2_U_Mosfet_3_2: R2_U_Mosfet_3.2 U1_U_Mosfet_3.2
NetR2_U_Mosfet_4_2: R2_U_Mosfet_4.2 U1_U_Mosfet_4.2
NetR3_U_Mosfet_1_1: R3_U_Mosfet_1.1 U1_U_Mosfet_1.6
NetR3_U_Mosfet_2_1: R3_U_Mosfet_2.1 U1_U_Mosfet_2.6
NetR3_U_Mosfet_3_1: R3_U_Mosfet_3.1 U1_U_Mosfet_3.6
NetR3_U_Mosfet_4_1: R3_U_Mosfet_4.1 U1_U_Mosfet_4.6
NetR4_U_Mosfet_1_1: R4_U_Mosfet_1.1 U1_U_Mosfet_1.7
NetR4_U_Mosfet_2_1: R4_U_Mosfet_2.1 U1_U_Mosfet_2.7
NetR4_U_Mosfet_3_1: R4_U_Mosfet_3.1 U1_U_Mosfet_3.7
NetR4_U_Mosfet_4_1: R4_U_Mosfet_4.1 U1_U_Mosfet_4.7
NetR5_U_Mosfet_1_2: R5_U_Mosfet_1.2 U1_U_Mosfet_1.3
NetR5_U_Mosfet_2_2: R5_U_Mosfet_2.2 U1_U_Mosfet_2.3
NetR5_U_Mosfet_3_2: R5_U_Mosfet_3.2 U1_U_Mosfet_3.3
NetR5_U_Mosfet_4_2: R5_U_Mosfet_4.2 U1_U_Mosfet_4.3
PGND: D1_U_Mosfet_3.1 D1_U_Mosfet_4.1 Q1_U_Mosfet_3.2 Q1_U_Mosfet_3.3 Q1_U_Mosfet_3.4 Q1_U_Mosfet_3.5 Q1_U_Mosfet_3.6 Q1_U_Mosfet_3.7 Q1_U_Mosfet_4.2 Q1_U_Mosfet_4.3 Q1_U_Mosfet_4.4 Q1_U_Mosfet_4.5 Q1_U_Mosfet_4.6 Q1_U_Mosfet_4.7 R1_U_Mosfet_3.1 R1_U_Mosfet_4.1
PWM_U_Mosfet_1_N: P?.6 R5_U_Mosfet_1.1 R6_U_Mosfet_1.2
PWM_U_Mosfet_1_P: P?.4 R2_U_Mosfet_1.1
PWM_U_Mosfet_2_N: P?.10 R5_U_Mosfet_2.1 R6_U_Mosfet_2.2
PWM_U_Mosfet_2_P: P?.8 R2_U_Mosfet_2.1
PWM_U_Mosfet_3_N: P?.7 R5_U_Mosfet_3.1 R6_U_Mosfet_3.2
PWM_U_Mosfet_3_P: P?.12 R2_U_Mosfet_3.1
PWM_U_Mosfet_4_N: P?.5 R5_U_Mosfet_4.1 R6_U_Mosfet_4.2
PWM_U_Mosfet_4_P: P?.3 R2_U_Mosfet_4.1
pads on no net: D2_U_Mosfet_1.1 D2_U_Mosfet_2.1 D2_U_Mosfet_3.1 D2_U_Mosfet_4.1 Designator4.1 P?.9

## Keep-outs
Keep-Out Layer:
  the board outline again, w0.254

## Text inside footprints (layer, text, board x,y; h text height)
PS1_U_Mosfet_1: Top Overlay "GND" at 259.076,16.293 h0.76 r90; Top Overlay "Vin" at 259.068,18.866 h0.76 r90; Top Overlay "+Vo" at 259.083,23.829 h0.76 r90; Top Overlay "0V" at 259.065,21.708 h0.76 r90
PS1_U_Mosfet_2: Top Overlay "GND" at 266.177,75.393 h0.76 r90; Top Overlay "Vin" at 266.169,77.966 h0.76 r90; Top Overlay "+Vo" at 266.184,82.93 h0.76 r90; Top Overlay "0V" at 266.166,80.808 h0.76 r90
PS1_U_Mosfet_3: Top Overlay "GND" at 265.277,105.393 h0.76 r90; Top Overlay "Vin" at 265.269,107.966 h0.76 r90; Top Overlay "+Vo" at 265.284,112.93 h0.76 r90; Top Overlay "0V" at 265.266,110.808 h0.76 r90
PS1_U_Mosfet_4: Top Overlay "GND" at 256.277,130.393 h0.76 r90; Top Overlay "Vin" at 256.269,132.966 h0.76 r90; Top Overlay "+Vo" at 256.284,137.93 h0.76 r90; Top Overlay "0V" at 256.266,135.808 h0.76 r90
U1_U_Mosfet_1: Top Overlay "Designator13" at 497.841,15.153 h1.27 r90
U1_U_Mosfet_2: Top Overlay "Designator13" at 511.142,74.253 h1.27 r90
U1_U_Mosfet_3: Top Overlay "Designator13" at 510.242,104.353 h1.27 r90
U1_U_Mosfet_4: Top Overlay "Designator13" at 501.242,129.253 h1.27 r90